# Altium PCB Kasli-DIOT.PCBDOC (part 8 of 23)
Units mm, origin at the board's own origin, x right, y up, seen from the top; angles counter-clockwise.
Board outline 222.9 x 100 mm, 10 copper layers (TopLayer, Layer 2, Layer 3, Layer 4, Layer 5, Layer 6, Layer 7, layer 8, Layer 9, BottomLayer), stack 1.564 mm thick; 977 components, 900 nets, 4676 pads, 2725 vias.
Unrouted connection lines stored in the file: 17.
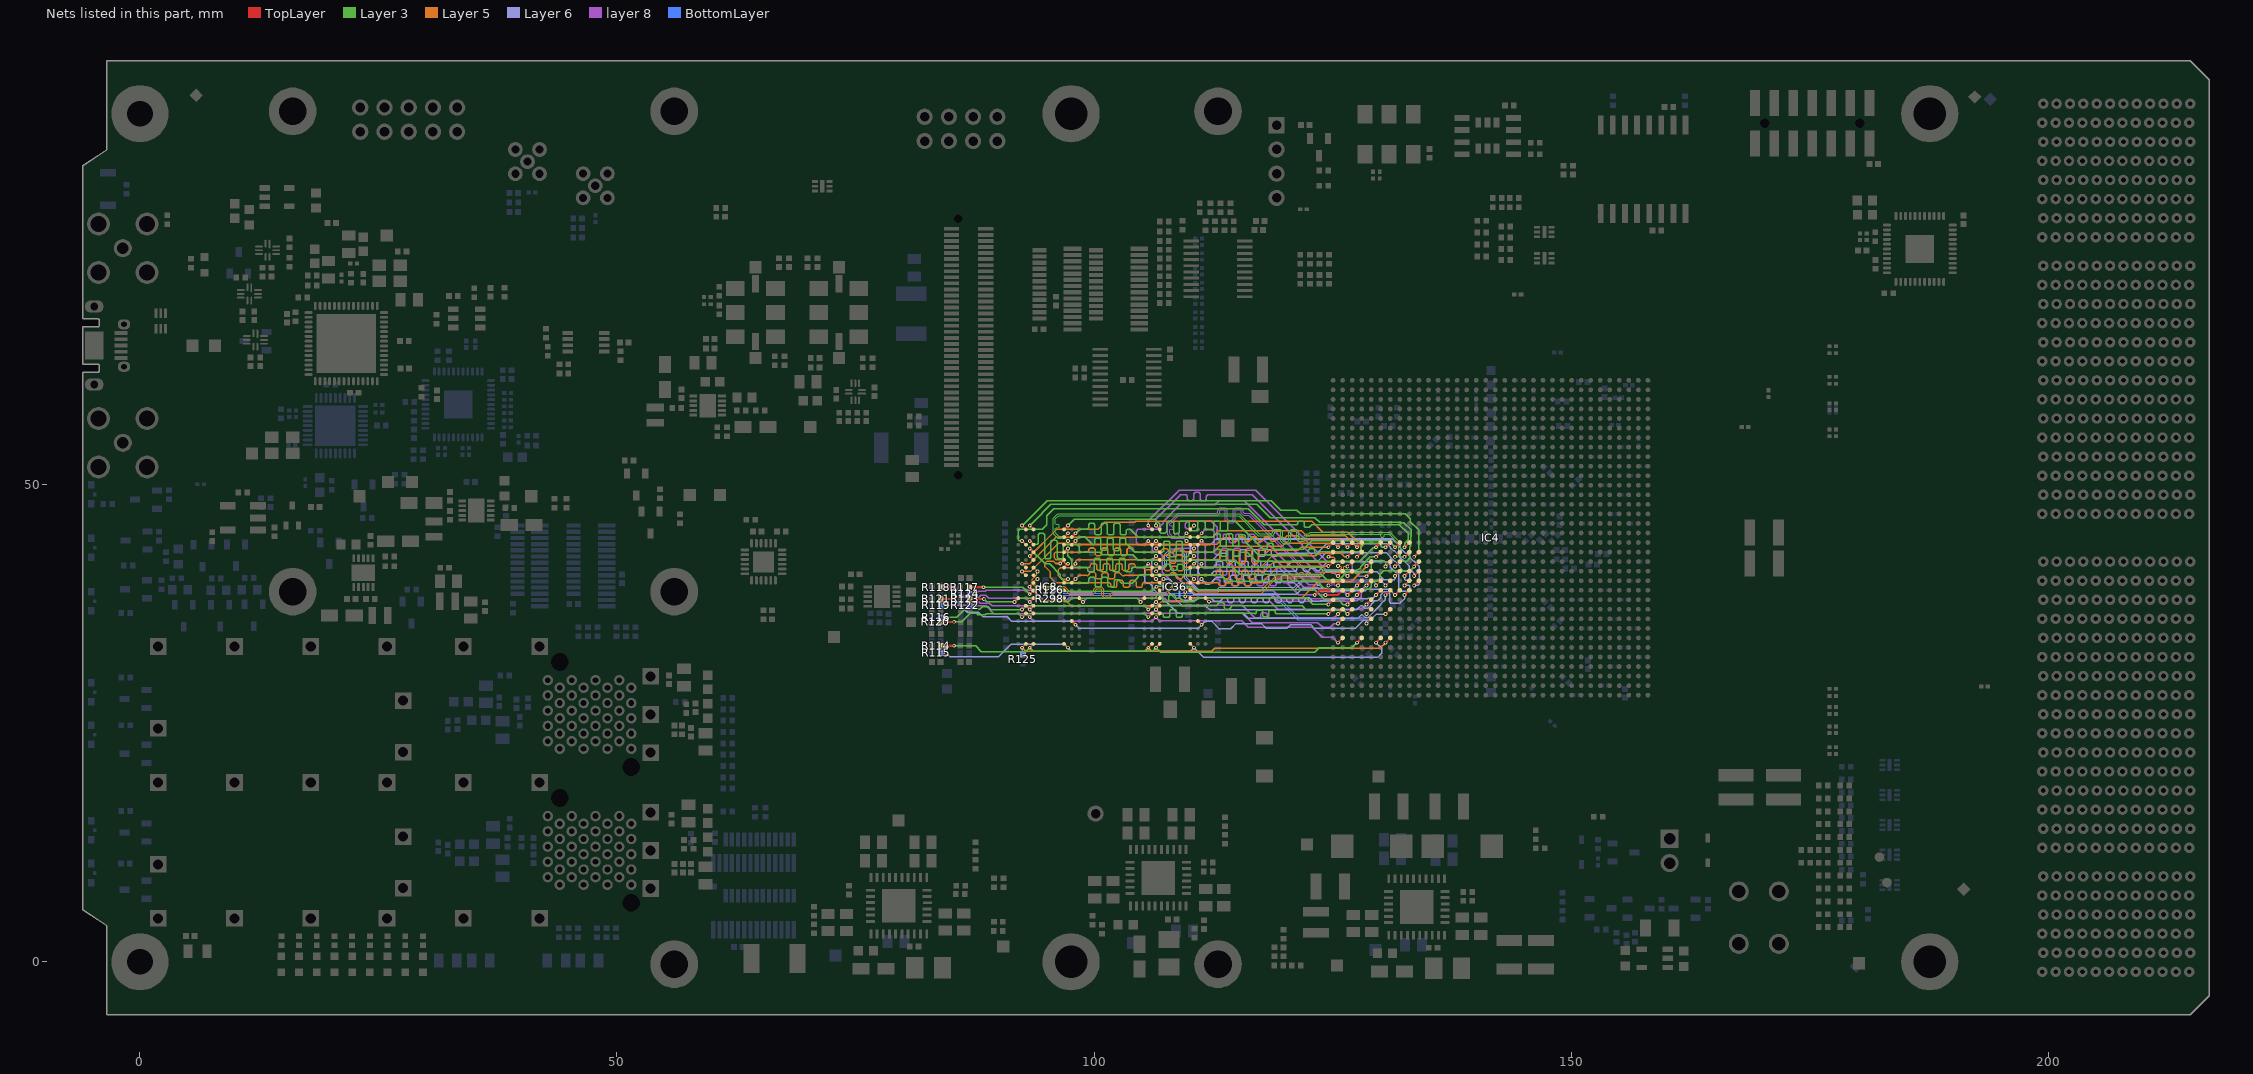
[diagram p14: the nets of this part, all layers, seen from the top]

## Via types
v1: diameter 0.4, hole 0.2, TopLayer to BottomLayer, tented both sides, 1723 vias
v2: diameter 0.5, hole 0.2, TopLayer to BottomLayer, tented both sides, 524 vias
v3: diameter 0.6, hole 0.3, TopLayer to BottomLayer, tented both sides, 172 vias
v4: diameter 0.6, hole 0.3, TopLayer to BottomLayer, 113 vias
v5: diameter 0.5, hole 0.2, TopLayer to BottomLayer, 107 vias
v6: diameter 0.4, hole 0.2, TopLayer to BottomLayer, 67 vias
v7: diameter 0.5, hole 0.25, TopLayer to BottomLayer, tented both sides, 12 vias
v8: diameter 0.8, hole 0.5, TopLayer to BottomLayer, tented both sides, 7 vias

## Nets (pads, with @x,y where several pads share a name; then routed paths per layer and width w, separated by ;. In a path a pad name is that pad's centre, name@x,y a point inside that pad or via, vN(x,y) a via of type N, cw(c..) or ccw(c..) an arc to the next point about the centre after c; other vN are vias at no path point) (continued)
DDR_A13: IC4.AH4 IC8.T3 IC36.T3 R114.1 | length 46.9
  TopLayer w0.22: R114.1@83.931,33.126 v1(85.342,33.126) v1@85.431,33.126 ; v1(93.264,32.925) 93.664,33.325 IC8.T3@93.661,33.325 ; v1(106.489,32.925) 106.889,33.325 IC36.T3@106.886,33.325 ; v1(127.561,33.45) IC4.AH4@128.061,33.95
  Layer 3 w0.15: v1(85.342,33.126) 87.585,33.126 88.186,32.525 92.864,32.525 v1(93.264,32.925) 93.639,32.55 105.844,32.55 105.869,32.575 106.139,32.575 v1(106.489,32.925) 106.989,32.425 123.136,32.425 123.611,32.9 127.011,32.9 v1(127.561,33.45)
DDR_A14: IC4.AH6 IC8.T7 IC36.T7 R115.1 | length 51.2
  TopLayer w0.22: IC8.T7@96.861,33.325 96.861,33.328 v1(97.261,32.928) ; IC36.T7@110.086,33.325 110.086,33.328 v1(110.486,32.928) ; v1(129.561,33.45) IC4.AH6@130.061,33.95
  Layer 6 w0.16: v1(84.489,32.38) 84.894,31.975 89.986,31.975 91.318,33.307 96.882,33.307 v1(97.261,32.928) 97.646,32.543 110.101,32.543 v1(110.486,32.928) 111.514,31.9 129.711,31.9 130.154,32.343 130.154,32.857 v1(129.561,33.45)
  BottomLayer w0.22: R115.1@83.911,32.38 v1(84.489,32.38)
DDR_BA0: IC4.AE1 IC8.M2 IC36.M2 R120.1 | length 46.9
  TopLayer w0.22: R120.1@83.892,35.638 v1(85.342,35.638) v1@85.392,35.638 ; v1(92.464,36.125) 92.864,36.525 IC8.M2@92.861,36.525 ; v1(105.689,36.125) 106.089,36.525 IC36.M2@106.086,36.525 ; v1(124.561,36.45) IC4.AE1@125.061,36.95
  Layer 3 w0.15: v1@85.392,35.638 85.403,35.65 86.161,35.65 87.041,36.53 87.696,36.53 87.822,36.404 88.618,36.404 88.715,36.502 92.087,36.502 v1(92.464,36.125) 92.844,36.505 105.309,36.505 v1(105.689,36.125) 106.069,36.505 106.452,36.505 107.185,36.505 107.284,36.406 107.284,36.23 107.383,36.131 107.843,36.131 107.942,36.23 107.942,36.779 108.041,36.878 108.501,36.878 108.6,36.779 108.6,36.23 108.699,36.131 109.159,36.131 109.258,36.23 109.258,36.406 109.357,36.505 110.071,36.505 110.305,36.505 110.341,36.54 110.651,36.54 ; 110.652,36.539 116.81,36.539 116.845,36.505 116.92,36.505 117.018,36.603 117.018,36.729 117.117,36.828 117.578,36.828 117.676,36.729 117.676,36.28 117.775,36.181 118.236,36.181 118.334,36.28 118.334,36.729 118.433,36.828 118.894,36.828 118.992,36.729 118.992,36.603 119.091,36.505 119.261,36.505 124.348,36.505 124.355,36.498 124.513,36.498 v1(124.561,36.45)
DDR_BA1: IC4.AE7 IC8.N8 IC36.N8 R121.1 | length 51.9
  TopLayer w0.22: R121.1@83.911,38.033 v1(85.342,38.033) v1@85.411,38.033 ; IC8.N8@97.661,35.725 97.661,35.728 v1(98.061,35.328) ; IC36.N8@110.886,35.725 110.886,35.728 v1(111.286,35.328) ; v1(130.561,36.45) IC4.AE7@131.061,36.95
  Layer 6 w0.16: v1(85.342,38.033) 86.725,36.65 87.868,36.65 88.353,36.165 90.906,36.165 91.361,35.71 97.679,35.71 v1(98.061,35.328) 98.446,34.943 110.901,34.943 v1(111.286,35.328) 111.668,35.71 112.302,35.71 113.108,34.904 114.344,34.904 114.891,35.45 117.559,35.45 118.066,34.943 120.21,34.943 120.592,35.325 122.739,35.325 122.789,35.275 123.121,34.943 127.387,34.943 128.269,35.825 128.986,35.825 129.611,36.45 v1(130.561,36.45)
DDR_BA2: IC4.AH2 IC8.M3 IC36.M3 R122.1 | length 42.4
  TopLayer w0.22: v1(93.264,36.125) 93.664,36.525 IC8.M3@93.661,36.525 ; v1(106.489,36.125) 106.889,36.525 IC36.M3@106.886,36.525 ; v1(125.561,33.45) IC4.AH2@126.061,33.95
  layer 8 w0.15: v1(87.529,37.355) 87.575,37.309 88.702,37.309 89.509,36.502 92.887,36.502 v1(93.264,36.125) 93.683,35.705 106.069,35.705 v1(106.489,36.125) 106.863,35.751 115.46,35.751 116.16,35.051 122.86,35.051 123.911,34 125.011,34 v1(125.561,33.45)
  BottomLayer w0.22: R122.1@86.951,37.355 v1(87.529,37.355)
DDR_CAS_N: IC4.AE2 IC8.K3 IC36.K3 R118.1 | length 46.3
  TopLayer w0.22: R118.1@83.911,39.26 v1(85.342,39.26) v1@85.411,39.26 ; v1(93.264,37.725) 93.664,38.125 IC8.K3@93.661,38.125 ; v1(106.489,37.725) 106.889,38.125 IC36.K3@106.886,38.125 ; v1(125.561,36.45) IC4.AE2@126.061,36.95
  layer 8 w0.15: v1@85.46,39.26 85.411,39.26 86.491,38.18 87.891,38.18 88.146,38.435 88.652,38.435 88.969,38.119 92.87,38.119 v1(93.264,37.725) 93.641,37.348 106.112,37.348 v1(106.489,37.725) 106.864,37.35 115.561,37.35 116.863,36.048 117.286,36.048 117.361,36.048 117.493,36.18 117.493,36.447 117.624,36.578 118.019,36.578 118.151,36.447 118.151,36.18 118.282,36.048 119.528,36.048 125.159,36.048 v1(125.561,36.45)
DDR_CK_N: IC4.AF5 IC8.K7 IC36.K7 R298.1 | length 36.2
  TopLayer w0.12: v1(96.407,38.303) 96.461,38.25 96.66,38.25 96.785,38.125 IC8.K7@96.861,38.125 ; v1(109.561,38.282) 109.876,38.282 110.033,38.125 IC36.K7@110.086,38.125 ; v1(128.561,35.45) IC4.AF5@129.061,35.95
  BottomLayer w0.12: R298.1@95.856,38.075 96.084,38.303 v1(96.407,38.303) 96.48,38.303 96.618,38.441 102.992,38.441 103.013,38.42 109.351,38.42 109.488,38.282 v1(109.561,38.282) 109.634,38.282 109.771,38.42 118.791,38.42 121.358,35.853 128.483,35.853 128.561,35.775 v1(128.561,35.45)
DDR_CK_P: IC4.AE5 IC8.J7 IC36.J7 R126.1 | length 36.2
  TopLayer w0.12: v1(96.407,38.788) 96.461,38.842 96.702,38.842 96.785,38.925 IC8.J7@96.861,38.925 ; v1(109.561,38.767) 109.876,38.767 110.033,38.925 IC36.J7@110.086,38.925 ; v1(128.561,36.45) IC4.AE5@129.061,36.95
  BottomLayer w0.12: R126.1@95.856,39.025 95.856,39.018 96.086,38.788 v1(96.407,38.788) 96.48,38.788 96.618,38.651 103.079,38.651 103.1,38.63 109.351,38.63 109.488,38.767 v1(109.561,38.767) 109.634,38.767 109.771,38.63 118.878,38.63 121.445,36.063 128.491,36.063 128.561,36.133 v1(128.561,36.45)
DDR_CKE: IC4.AD5 IC8.K9 IC36.K9 R124.1 | length 45.4
  TopLayer w0.22: IC8.K9@98.461,38.125 98.461,38.128 v1(98.861,37.728) ; IC36.K9@111.686,38.125 v1(112.061,37.75) ; v1(128.561,37.45) IC4.AD5@129.061,37.95
  layer 8 w0.15: v1(87.529,38.582) 87.594,38.582 87.87,38.858 88.597,38.858 88.682,38.943 93.624,38.943 94.668,37.898 97.159,37.898 97.42,38.159 98.43,38.159 v1(98.861,37.728) 99.245,38.112 107.399,38.112 107.661,37.85 109.961,37.85 110.236,38.125 111.686,38.125 v1(112.061,37.75) 118.461,37.75 118.561,37.65 119.261,36.95 126.361,36.95 128.061,36.95 v1(128.561,37.45)
  BottomLayer w0.22: R124.1@86.951,38.582 v1(87.529,38.582)
DDR_CS_N: IC4.AE3 IC8.L2 IC36.L2 R116.1 | length 46.8
  TopLayer w0.22: v1(92.464,36.925) 92.864,37.325 IC8.L2@92.861,37.325 ; v1(105.689,36.925) 106.089,37.325 IC36.L2@106.086,37.325 ; v1(126.561,36.45) IC4.AE3@127.061,36.95
  Layer 3 w0.15: v1(84.489,36.115) 85.639,36.115 86.477,36.953 88.029,36.953 88.284,37.208 88.894,37.208 89.177,36.925 v1(92.464,36.925) 92.844,37.305 105.309,37.305 v1(105.689,36.925) 106.069,37.305 112.786,37.305 112.861,37.305 112.993,37.436 112.993,37.518 113.124,37.65 113.519,37.65 113.651,37.518 113.651,37.09 113.782,36.959 114.177,36.959 114.309,37.09 114.309,37.173 114.44,37.305 114.461,37.305 114.536,37.305 121.806,37.305 122.261,36.85 123.861,36.85 123.863,36.852 126.159,36.852 v1(126.561,36.45)
  BottomLayer w0.22: R116.1@83.911,36.115 v1(84.489,36.115)
DDR_DM0: IC4.AB10 IC36.E7 | length 30.5
  TopLayer w0.22: IC36.E7@110.086,42.125 110.083,42.125 v1(110.483,42.525) ; v1(133.561,39.45) IC4.AB10@134.061,39.95
  Layer 6 w0.16: v1(110.483,42.525) 110.091,42.918 110.091,43.481 110.425,43.815 111.077,43.815 111.137,43.755 112.23,43.755 112.793,44.319 131.271,44.319 132.061,43.529 132.061,43.413 132.624,42.85 132.732,42.85 133.128,42.453 133.128,42.345 133.497,41.976 133.572,41.976 133.941,41.607 133.941,41.6 134.086,41.455 134.086,39.6 133.936,39.45 v1(133.561,39.45)
DDR_DM1: IC4.AC1 IC36.D3 | length 29.6
  TopLayer w0.22: v1(106.486,43.322) 106.886,42.922 IC36.D3@106.886,42.925 ; v1(123.138,38.45) 123.161,38.45 123.661,38.95 IC4.AC1@125.061,38.95
  layer 8 w0.15: v1(106.486,43.322) 106.875,43.711 110.703,43.711 110.886,43.528 110.886,39.929 111.065,39.75 111.422,39.75 111.425,39.747 112.311,39.747 112.386,39.747 112.518,39.879 112.518,39.961 112.649,40.093 113.044,40.093 113.176,39.961 113.176,39.533 113.307,39.401 113.702,39.401 113.834,39.533 113.834,39.961 113.965,40.093 114.36,40.093 114.492,39.961 114.492,39.533 114.623,39.401 115.018,39.401 115.15,39.533 115.15,39.961 115.281,40.093 115.676,40.093 115.808,39.961 115.808,39.533 115.939,39.401 116.334,39.401 116.466,39.533 116.466,39.961 116.597,40.093 116.992,40.093 117.124,39.961 117.124,39.533 117.255,39.401 117.65,39.401 117.782,39.533 117.782,39.961 117.913,40.093 118.308,40.093 118.44,39.961 118.44,39.533 118.571,39.401 118.966,39.401 119.098,39.533 119.098,39.961 119.229,40.093 119.624,40.093 119.756,39.961 119.756,39.879 119.887,39.747 120.07,39.747 120.189,39.747 121.486,38.45 v1(123.138,38.45)
DDR_DM2: IC4.Y1 IC8.E7 | length 38.9
  TopLayer w0.22: v1(96.461,41.75) 96.474,41.75 96.848,42.125 IC8.E7@96.861,42.125 ; v1(124.561,41.479) 124.59,41.479 IC4.Y1@125.061,41.95
  Layer 5 w0.16: v1(96.461,41.75) 95.979,41.75 95.729,42 95.086,42 94.861,41.775 94.861,41.425 95.436,40.85 95.436,40.275 95.976,39.735 101.069,39.735 101.082,39.748 101.605,39.748 101.738,39.614 101.738,39.398 101.872,39.264 102.273,39.264 102.406,39.398 102.406,39.848 102.54,39.982 102.941,39.982 103.074,39.848 103.074,39.398 103.208,39.264 103.609,39.264 103.742,39.398 103.742,39.848 103.876,39.982 104.277,39.982 104.41,39.848 104.41,39.398 104.544,39.264 104.945,39.264 105.078,39.398 105.078,39.614 105.212,39.748 105.292,39.748 112.211,39.748 112.959,39.748 113.093,39.614 113.093,39.535 113.226,39.402 113.627,39.402 113.761,39.535 113.761,39.62 113.894,39.753 114.295,39.753 114.429,39.62 114.429,39.535 114.562,39.402 114.963,39.402 115.097,39.535 115.097,39.62 115.23,39.753 115.631,39.753 115.765,39.62 115.765,39.535 115.898,39.402 116.299,39.402 116.433,39.535 116.433,39.614 116.566,39.748 116.678,39.748 117.584,39.748 119.286,41.45 124.532,41.45 v1(124.561,41.479)
DDR_DM3: IC4.Y10 IC8.D3 | length 49.5
  TopLayer w0.22: v1(93.261,43.322) 93.661,42.922 IC8.D3@93.661,42.925 ; v1(133.561,41.45) IC4.Y10@134.061,41.95
  Layer 3 w0.15: v1(93.261,43.322) 94.883,41.7 95.336,41.7 96.461,40.575 96.461,40.32 97.081,39.7 99.261,39.7 99.336,39.7 99.468,39.832 99.468,40.168 99.599,40.3 99.994,40.3 100.126,40.168 100.126,39.424 100.257,39.292 100.652,39.292 100.784,39.424 100.784,40.168 100.915,40.3 101.31,40.3 101.442,40.168 101.442,39.424 101.573,39.292 101.968,39.292 102.1,39.424 102.1,39.908 102.231,40.04 102.626,40.04 102.758,39.908 102.758,39.832 102.889,39.7 103.33,39.7 103.986,39.7 104.511,40.225 104.511,40.278 104.781,40.547 113.289,40.547 113.968,39.868 123.396,39.868 124.212,39.052 128.779,39.052 129.05,39.322 129.05,39.622 129.295,39.868 129.648,39.868 129.936,40.156 129.936,40.575 130.361,41.001 133.154,41.001 133.561,41.408 v1(133.561,41.45)
DDR_DQ0: IC4.AC8 IC36.E3 | length 30.4
  TopLayer w0.22: v1(106.486,42.522) 106.883,42.125 IC36.E3@106.886,42.125 ; v1(131.561,38.45) IC4.AC8@132.061,38.95
  Layer 6 w0.16: v1(106.486,42.522) 106.061,42.097 106.061,40.687 106.198,40.55 108.45,40.55 110.45,38.55 110.941,38.55 110.944,38.548 111.623,38.548 111.625,38.55 121.261,38.55 121.861,39.15 124.324,39.15 124.404,39.07 124.425,39.07 124.595,38.9 126.406,38.9 126.422,38.883 128.426,38.883 128.615,39.073 130.938,39.073 v1(131.561,38.45)
DDR_DQ1: IC4.AA10 IC36.F7 | length 31.3
  TopLayer w0.22: IC36.F7@110.086,41.325 110.083,41.325 v1(110.483,41.725) ; v1(133.561,40.45) IC4.AA10@134.061,40.95
  Layer 6 w0.16: v1(110.483,41.725) 110.883,42.125 112.436,42.125 113.161,42.85 113.711,42.85 113.791,42.85 113.925,42.984 113.925,43.062 114.058,43.196 114.459,43.196 114.593,43.062 114.593,42.638 114.726,42.504 115.127,42.504 115.261,42.638 115.261,43.062 115.394,43.196 115.795,43.196 115.929,43.062 115.929,42.638 116.062,42.504 116.463,42.504 116.597,42.638 116.597,43.062 116.73,43.196 117.131,43.196 117.265,43.062 117.265,42.638 117.398,42.504 117.799,42.504 117.933,42.638 117.933,43.062 118.066,43.196 118.467,43.196 118.601,43.062 118.601,42.638 118.734,42.504 119.135,42.504 119.269,42.638 119.269,42.716 119.402,42.85 119.632,42.85 123.411,42.85 124.376,43.815 124.389,43.815 124.404,43.83 124.718,43.83 124.733,43.815 125.389,43.815 125.404,43.83 125.718,43.83 125.733,43.815 126.389,43.815 126.404,43.83 126.718,43.83 126.733,43.815 127.389,43.815 127.404,43.83 127.718,43.83 127.733,43.815 128.389,43.815 128.404,43.83 128.718,43.83 128.733,43.815 129.389,43.815 129.404,43.83 129.718,43.83 129.733,43.815 130.389,43.815 130.404,43.83 130.718,43.83 131.061,43.487 131.061,43.413 131.404,43.07 131.5,43.07 132.043,42.526 132.043,42.412 132.37,42.085 132.436,42.085 132.674,41.846 132.702,41.846 132.941,41.607 132.941,41.58 133.061,41.46 133.061,41.225 133.547,40.739 133.547,40.464 v1(133.561,40.45)
DDR_DQ2: IC4.AC7 IC36.F2 | length 31.8
  TopLayer w0.22: v1(105.681,41.73) 105.681,41.727 106.083,41.325 IC36.F2@106.086,41.325 ; v1(130.561,38.429) 130.561,38.45 IC4.AC7@131.061,38.95
  Layer 6 w0.16: v1(105.681,41.73) 105.681,41.717 105.3,41.336 105.3,39.91 105.523,39.687 105.827,39.687 106.1,39.414 106.1,39.208 106.373,38.935 106.383,38.935 108.772,36.546 115.64,36.546 116.168,36.018 127.666,36.018 128.005,36.357 128.138,36.357 128.41,36.085 128.733,36.085 130.067,37.418 130.067,37.493 130.535,37.961 130.535,38.403 v1(130.561,38.429)
DDR_DQ3: IC4.AA9 IC36.F8 | length 31.6
  TopLayer w0.22: IC36.F8@110.886,41.325 110.883,41.325 v1(111.283,41.725) ; v1(132.561,40.45) IC4.AA9@133.061,40.95
  Layer 6 w0.16: v1(111.283,41.725) 111.304,41.704 111.304,41.414 111.398,41.32 112.235,41.32 112.24,41.314 112.537,41.314 112.607,41.385 112.687,41.385 112.821,41.519 112.821,41.876 112.954,42.01 113.355,42.01 113.489,41.876 113.489,41.494 113.622,41.361 114.023,41.361 114.157,41.494 114.157,41.876 114.29,42.01 114.691,42.01 114.825,41.876 114.825,41.494 114.958,41.361 115.359,41.361 115.493,41.494 115.493,41.876 115.626,42.01 116.027,42.01 116.161,41.876 116.161,41.494 116.294,41.361 116.695,41.361 116.829,41.494 116.829,41.876 116.962,42.01 117.363,42.01 117.497,41.876 117.497,41.494 117.63,41.361 118.031,41.361 118.165,41.494 118.165,41.876 118.298,42.01 118.699,42.01 118.833,41.876 118.833,41.519 118.966,41.385 120.143,41.385 120.785,42.027 123.479,42.027 124.354,42.902 130.632,42.902 130.703,42.83 130.718,42.83 131.061,42.487 131.061,42.413 131.464,42.01 131.538,42.01 132.033,41.516 132.033,41.378 132.491,40.92 132.916,40.92 133.086,40.75 133.086,40.125 132.937,39.976 132.688,39.976 132.595,40.069 132.595,40.416 v1(132.561,40.45)
DDR_DQ4: IC4.AC6 IC36.H3 | length 30.5
  TopLayer w0.22: IC36.H3@106.886,39.725 107.286,40.125 v1(107.286,40.128) ; v1(129.561,38.45) IC4.AC6@130.061,38.95
  Layer 6 w0.16: v1(107.286,40.128) 107.291,40.122 107.889,40.122 108.961,39.05 108.961,38.15 109.228,37.883 110.664,37.883 110.935,38.154 112.232,38.154 112.593,37.793 113.15,37.793 113.23,37.793 113.385,37.949 113.385,38.004 113.541,38.16 113.852,38.16 114.007,38.004 114.007,37.805 114.163,37.65 114.474,37.65 114.629,37.805 114.629,38.004 114.785,38.16 115.096,38.16 115.251,38.004 115.251,37.805 115.407,37.65 115.718,37.65 115.873,37.805 115.873,38.004 116.029,38.16 116.34,38.16 116.495,38.004 116.495,37.805 116.651,37.65 116.962,37.65 117.117,37.805 117.117,38.004 117.273,38.16 117.584,38.16 117.739,38.004 117.739,37.805 117.895,37.65 118.206,37.65 118.361,37.805 118.361,38.004 118.517,38.16 118.828,38.16 118.983,38.004 118.983,37.805 119.139,37.65 119.45,37.65 119.605,37.805 119.605,38.004 119.761,38.16 120.072,38.16 120.227,38.004 120.227,37.805 120.383,37.65 120.694,37.65 120.849,37.805 120.849,38.004 121.005,38.16 121.316,38.16 121.471,38.004 121.471,37.805 121.627,37.65 121.938,37.65 122.093,37.805 122.093,38.004 122.249,38.16 122.56,38.16 122.715,38.004 122.715,37.949 122.871,37.793 123.391,37.793 123.712,37.793 123.769,37.85 124.991,37.85 125.241,38.1 126.374,38.1 126.404,38.07 128.718,38.07 128.748,38.1 129.211,38.1 v1(129.561,38.45)
DDR_DQ5: IC4.AA8 IC36.H8 | length 30.6
  TopLayer w0.22: IC36.H8@110.886,39.725 110.886,39.728 111.283,40.125 v1(111.283,40.128) ; v1(131.561,40.45) IC4.AA8@132.061,40.95
  Layer 6 w0.16: v1(111.283,40.128) 111.283,40.063 111.394,39.952 111.394,39.934 111.728,39.6 112.111,39.6 112.788,40.277 112.836,40.325 113.536,40.325 113.636,40.225 113.636,39.846 113.736,39.745 114.204,39.745 114.304,39.846 114.304,40.41 114.404,40.51 114.872,40.51 114.972,40.41 114.972,39.846 115.072,39.745 115.54,39.745 115.64,39.846 115.64,40.41 115.74,40.51 116.208,40.51 116.308,40.41 116.308,39.846 116.408,39.745 116.876,39.745 116.976,39.846 116.976,40.41 117.076,40.51 117.544,40.51 117.644,40.41 117.644,39.846 117.744,39.745 118.212,39.745 118.312,39.846 118.312,40.41 118.412,40.51 118.88,40.51 118.98,40.41 118.98,39.846 119.08,39.745 119.548,39.745 119.648,39.846 119.648,40.41 119.748,40.51 120.216,40.51 120.316,40.41 120.316,39.846 120.416,39.745 120.884,39.745 120.984,39.846 120.984,40.33 121.084,40.43 121.232,40.43 123.841,40.43 124.318,40.907 129.641,40.907 129.941,40.607 129.941,40.491 130.382,40.05 131.467,40.05 131.561,40.144 v1(131.561,40.45)
DDR_DQ6: IC4.AC9 IC36.G2 | length 31.5
  TopLayer w0.22: IC36.G2@106.086,40.525 106.483,40.128 v1(106.486,40.128) ; v1(132.561,38.45) IC4.AC9@133.061,38.95
  Layer 6 w0.16: v1(106.486,40.128) 106.486,40.078 108.914,37.65 109.234,37.33 111.706,37.33 112.111,36.925 127.544,36.925 127.623,37.005 127.653,37.005 127.995,37.346 128.127,37.346 128.404,37.07 128.718,37.07 129.061,37.412 129.061,37.487 129.425,37.852 129.713,37.852 130.077,38.216 130.077,38.482 130.408,38.813 130.714,38.813 131.007,38.52 131.007,37.679 131.111,37.575 132.055,37.575 132.561,38.081 v1(132.561,38.45)
DDR_DQ7: IC4.AB9 IC36.H7 | length 31.1
  TopLayer w0.22: IC36.H7@110.086,39.725 110.086,39.728 110.483,40.125 v1(110.483,40.128) ; v1(132.561,39.45) IC4.AB9@133.061,39.95
  Layer 6 w0.16: v1(110.483,40.128) 110.481,40.128 110.103,40.505 110.103,41.129 110.305,41.331 110.705,41.331 110.911,41.125 110.911,40.785 110.918,40.778 110.918,40.774 111.132,40.56 112.235,40.56 112.448,40.774 112.448,40.809 112.589,40.95 121.04,40.95 121.12,40.95 121.253,41.084 121.253,41.342 121.387,41.475 121.788,41.475 121.921,41.342 121.921,41.082 122.055,40.948 122.456,40.948 122.589,41.082 122.589,41.135 122.723,41.269 123.124,41.269 123.257,41.135 123.257,41.119 123.391,40.985 123.58,40.985 123.71,41.116 123.71,41.166 124.404,41.859 124.421,41.859 124.512,41.95 130.718,41.95 131.061,41.607 131.061,41.354 131.569,40.846 131.702,40.846 131.941,40.607 131.941,39.293 131.924,39.276 131.924,39.037 132.102,38.859 132.945,38.859 133.111,39.025 133.111,39.381 133.017,39.475 132.586,39.475 v1(132.561,39.45)
DDR_DQ8: IC4.AC4 IC36.D7 | length 29.1
  TopLayer w0.22: IC36.D7@110.086,42.925 110.086,42.928 110.48,43.322 v1(110.483,43.322) ; v1(127.561,38.45) IC4.AC4@128.061,38.95
  layer 8 w0.15: v1(110.483,43.322) 110.48,43.325 108.586,43.325 108.286,43.025 108.286,42.754 108.418,42.623 109.398,42.623 109.53,42.491 109.53,42.096 109.398,41.965 108.072,41.965 107.94,41.833 107.94,41.438 108.072,41.307 108.154,41.307 108.286,41.175 108.286,41.1 108.286,40.8 109.461,39.625 110.186,39.625 110.911,38.9 118.811,38.9 119.644,38.067 127.178,38.067 v1(127.561,38.45)
DDR_DQ9: IC4.AB5 IC36.C3 | length 29.2
  TopLayer w0.22: v1(106.486,44.122) 106.886,43.722 IC36.C3@106.886,43.725 ; v1(128.561,39.45) IC4.AB5@129.061,39.95
  layer 8 w0.15: v1(106.486,44.122) 106.101,43.738 106.101,43.139 106.303,42.937 106.849,42.937 107.161,42.625 107.161,40.85 108.836,39.175 109.811,39.175 110.511,38.475 118.536,38.475 119.194,37.817 127.281,37.817 127.29,37.825 127.571,37.825 128.037,38.291 128.037,38.926 v1(128.561,39.45)
DDR_DQ10: IC4.AC2 IC36.C8 | length 28.9
  TopLayer w0.22: IC36.C8@110.886,43.725 110.886,43.728 111.283,44.125 v1(111.283,44.135) ; v1(124.261,38.442) 124.269,38.45 125.561,38.45 IC4.AC2@126.061,38.95
  layer 8 w0.15: v1(111.283,44.135) 111.283,44.125 111.675,43.733 111.675,41.493 111.853,41.315 112.232,41.315 112.258,41.289 112.382,41.289 112.457,41.289 112.589,41.421 112.589,41.504 112.72,41.635 113.115,41.635 113.247,41.504 113.247,40.631 113.378,40.499 113.773,40.499 113.905,40.631 113.905,41.504 114.036,41.635 114.431,41.635 114.563,41.504 114.563,40.631 114.694,40.499 115.089,40.499 115.221,40.631 115.221,41.504 115.352,41.635 115.747,41.635 115.879,41.504 115.879,40.631 116.01,40.499 116.405,40.499 116.537,40.631 116.537,41.504 116.668,41.635 117.063,41.635 117.195,41.504 117.195,40.631 117.326,40.499 117.721,40.499 117.853,40.631 117.853,41.504 117.984,41.635 118.379,41.635 118.511,41.504 118.511,40.631 118.642,40.499 119.037,40.499 119.169,40.631 119.169,41.158 119.3,41.289 119.405,41.289 119.422,41.289 121.761,38.95 123.211,38.95 123.711,38.45 124.253,38.45 v1(124.261,38.442)
DDR_DQ11: IC4.AA2 IC36.C2 | length 29.9
  TopLayer w0.22: v1(105.686,44.122) 106.086,43.722 IC36.C2@106.086,43.725 ; v1(125.561,40.45) IC4.AA2@126.061,40.95
  layer 8 w0.15: v1(105.686,44.122) 105.283,43.719 104.653,43.719 104.411,43.961 104.411,45.15 104.586,45.325 106.625,45.325 107.261,45.961 107.261,46.15 109.011,47.9 112.661,47.9 113.111,48.35 115.761,48.35 123.301,40.81 124.865,40.81 124.945,40.73 125.24,40.73 125.52,40.45 v1(125.561,40.45)
DDR_DQ12: IC4.AB4 IC36.A7 | length 29
  TopLayer w0.22: IC36.A7@110.086,45.325 110.083,45.325 v1(110.483,45.725) ; v1(127.561,39.45) IC4.AB4@128.061,39.95
  layer 8 w0.15: v1(110.483,45.725) 110.158,45.4 109.736,45.4 109.561,45.575 109.561,45.925 109.836,46.2 112.286,46.2 112.911,45.575 112.911,44.475 113.123,44.263 113.336,44.263 113.411,44.263 113.543,44.394 113.543,44.691 113.674,44.822 114.069,44.822 114.201,44.691 114.201,44.048 114.332,43.917 114.727,43.917 114.859,44.048 114.859,44.691 114.99,44.822 115.385,44.822 115.517,44.691 115.517,44.048 115.648,43.917 116.043,43.917 116.175,44.048 116.175,44.691 116.306,44.822 116.701,44.822 116.833,44.691 116.833,44.048 116.964,43.917 117.359,43.917 117.491,44.048 117.491,44.131 117.622,44.263 117.798,44.263 117.817,44.244 122.511,39.55 123.661,39.55 124.144,39.067 124.52,39.067 124.545,39.042 127.153,39.042 v1(127.561,39.45)
DDR_DQ13: IC4.AA5 IC36.A2 | length 30
  TopLayer w0.22: v1(105.686,45.722) 106.086,45.322 IC36.A2@106.086,45.325 ; v1(128.556,40.411) 128.556,40.445 IC4.AA5@129.061,40.95
  layer 8 w0.15: v1(105.686,45.722) 105.686,46.226 108.91,49.45 116.949,49.45 124.451,41.948 126.727,41.948 127.059,41.616 127.059,41.162 127.81,40.411 v1(128.556,40.411)
DDR_DQ14: IC4.AC3 IC36.B8 | length 29.2
  TopLayer w0.22: IC36.B8@110.889,44.525 IC36.B8@110.886,44.525 v1(111.286,44.925) ; v1(126.561,38.45) IC4.AC3@127.061,38.95
  layer 8 w0.15: v1(111.286,44.925) 111.683,45.322 112.349,45.322 112.586,45.085 112.586,42.892 112.803,42.675 113.136,42.675 113.211,42.675 113.343,42.807 113.343,43.227 113.474,43.359 113.869,43.359 114.001,43.227 114.001,42.13 114.132,41.998 114.527,41.998 114.659,42.13 114.659,43.227 114.79,43.359 115.185,43.359 115.317,43.227 115.317,42.13 115.448,41.998 115.843,41.998 115.975,42.13 115.975,43.227 116.106,43.359 116.501,43.359 116.633,43.227 116.633,42.13 116.764,41.998 117.159,41.998 117.291,42.13 117.291,43.227 117.422,43.359 117.817,43.359 117.949,43.227 117.949,42.807 118.08,42.675 118.308,42.675 118.536,42.675 121.961,39.25 123.361,39.25 123.823,38.788 124.077,38.788 124.106,38.817 124.416,38.817 124.445,38.788 126.223,38.788 v1(126.561,38.45)
DDR_DQ15: IC4.AA3 IC36.A3 | length 28.9
  TopLayer w0.22: v1(106.486,45.722) 106.886,45.322 IC36.A3@106.886,45.325 ; v1(126.561,40.45) IC4.AA3@127.061,40.95
  layer 8 w0.15: v1(106.486,45.722) 106.486,46.375 108.932,48.821 109.061,48.95 109.665,48.95 109.797,48.818 109.797,48.482 109.929,48.35 110.323,48.35 110.455,48.482 110.455,49.065 110.587,49.197 110.981,49.197 111.113,49.065 111.113,48.482 111.245,48.35 111.639,48.35 111.771,48.482 111.771,48.818 111.903,48.95 113.271,48.95 116.561,48.95 121.813,43.698 121.813,43.589 124.298,41.104 125.907,41.104 v1(126.561,40.45)
DDR_DQ16: IC4.W4 IC8.E3 | length 39.9
  TopLayer w0.22: v1(93.261,42.522) 93.661,42.122 IC8.E3@93.661,42.125 ; v1(127.561,42.45) IC4.W4@128.061,42.95
  Layer 5 w0.16: v1(93.261,42.522) 96.067,45.329 100.387,45.329 101.132,46.073 104.259,46.073 104.38,46.194 122.817,46.194 123.983,45.028 126.597,45.028 127.978,43.648 127.978,42.867 v1(127.561,42.45)
DDR_DQ17: IC4.V2 IC8.F7 | length 39
  TopLayer w0.22: IC8.F7@96.861,41.325 96.858,41.325 v1(97.258,41.725) ; v1(125.561,43.45) IC4.V2@126.061,43.95
  Layer 5 w0.16: v1(97.258,41.725) 97.241,41.742 97.009,41.742 96.601,42.15 96.036,42.15 95.811,42.375 95.811,42.775 95.98,42.944 98.993,42.944 99.029,42.979 99.222,42.979 99.236,42.965 99.316,42.965 99.45,43.099 99.45,43.242 99.583,43.376 99.984,43.376 100.118,43.242 100.118,42.716 100.251,42.582 100.652,42.582 100.786,42.716 100.786,43.242 100.919,43.376 101.32,43.376 101.454,43.242 101.454,42.716 101.587,42.582 101.988,42.582 102.122,42.716 102.122,43.242 102.255,43.376 102.656,43.376 102.79,43.242 102.79,42.716 102.923,42.582 103.324,42.582 103.458,42.716 103.458,43.242 103.591,43.376 103.992,43.376 104.126,43.242 104.126,43.099 104.259,42.965 104.513,42.965 104.575,42.965 104.61,42.93 106.85,42.93 106.886,42.965 106.966,42.965 107.1,43.099 107.1,43.178 107.233,43.311 107.634,43.311 107.768,43.178 107.768,43.031 107.901,42.898 108.302,42.898 108.436,43.031 108.436,43.178 108.569,43.311 108.97,43.311 109.104,43.178 109.104,43.099 109.237,42.965 109.811,42.965 109.843,42.933 112.494,42.933 113.111,43.55 119.692,43.55 119.992,43.85 125.161,43.85 v1(125.561,43.45)
DDR_DQ18: IC4.V4 IC8.F2 | length 38.5
  TopLayer w0.22: v1(92.461,41.722) 92.861,41.322 IC8.F2@92.861,41.325 ; v1(127.561,43.45) IC4.V4@128.061,43.95
  Layer 5 w0.16: v1(92.461,41.722) 93.233,41.722 96.017,44.506 104.733,44.506 104.742,44.516 112.23,44.516 112.239,44.506 112.417,44.506 113.11,45.199 121.712,45.199 122.261,44.65 126.361,44.65 v1(127.561,43.45)
DDR_DQ19: IC4.V1 IC8.F8 | length 39.2
  TopLayer w0.22: IC8.F8@97.661,41.325 97.658,41.325 v1(98.058,41.725) ; v1(124.561,43.45) IC4.V1@125.061,43.95
  Layer 5 w0.16: v1(98.058,41.725) 98.079,41.746 98.079,42.006 98.215,42.142 107.036,42.142 107.078,42.142 107.086,42.15 107.116,42.15 107.25,42.284 107.25,42.504 107.384,42.638 107.784,42.638 107.918,42.504 107.918,41.931 108.052,41.797 108.452,41.797 108.586,41.931 108.586,42.512 108.72,42.646 109.12,42.646 109.254,42.512 109.254,41.931 109.388,41.797 109.788,41.797 109.922,41.931 109.922,42.016 110.056,42.15 110.361,42.15 110.411,42.15 110.437,42.124 112.968,42.124 112.994,42.15 113.074,42.15 113.207,42.284 113.207,43.028 113.341,43.162 113.742,43.162 113.875,43.028 113.875,41.918 114.009,41.784 114.41,41.784 114.543,41.918 114.543,43.028 114.677,43.162 115.078,43.162 115.211,43.028 115.211,41.918 115.345,41.784 115.746,41.784 115.879,41.918 115.879,43.028 116.013,43.162 116.414,43.162 116.547,43.028 116.547,41.918 116.681,41.784 117.082,41.784 117.215,41.918 117.215,43.025 117.349,43.159 117.75,43.159 117.965,42.943 118.154,42.943 118.351,43.14 118.361,43.15 121.395,43.15 121.695,43.45 v1(124.561,43.45)
DDR_DQ20: IC4.Y5 IC8.H3 | length 39.2
  TopLayer w0.22: v1(93.223,39.318) 93.243,39.318 93.65,39.725 IC8.H3@93.661,39.725 ; v1(128.577,41.498) 128.609,41.498 IC4.Y5@129.061,41.95
  Layer 5 w0.16: v1(93.223,39.318) 93.223,39.308 93.991,38.539 94.68,37.85 97.061,37.85 97.261,37.65 97.598,37.313 106.624,37.313 106.961,37.65 107.061,37.75 109.861,37.75 110.261,38.15 121.795,38.15 123.495,39.85 126.961,39.85 128.577,41.466 v1(128.577,41.498)
DDR_DQ21: IC4.W1 IC8.H8 | length 38.9
  TopLayer w0.22: IC8.H8@97.661,39.725 97.658,39.725 v1(98.058,40.125) ; v1(124.572,42.461) IC4.W1@125.061,42.95
  Layer 5 w0.16: v1(98.058,40.125) 98.453,40.519 99.255,40.519 99.286,40.488 99.366,40.488 99.5,40.622 99.5,40.7 99.633,40.834 100.034,40.834 100.168,40.7 100.168,40.276 100.301,40.142 100.702,40.142 100.836,40.276 100.836,40.626 100.969,40.759 101.37,40.759 101.504,40.626 101.504,40.276 101.637,40.142 102.038,40.142 102.172,40.276 102.172,40.626 102.305,40.759 102.706,40.759 102.84,40.626 102.84,40.622 102.973,40.488 103.186,40.488 ; 103.194,40.496 104.722,40.496 104.729,40.502 105.043,40.502 105.05,40.496 105.133,40.496 ; 105.141,40.488 105.221,40.488 105.355,40.622 105.355,40.955 105.488,41.089 105.889,41.089 106.023,40.955 106.023,40.622 106.156,40.488 106.311,40.488 106.352,40.529 107.72,40.529 107.761,40.488 107.841,40.488 107.975,40.622 107.975,40.635 108.108,40.768 108.509,40.768 108.643,40.635 108.643,40.276 108.776,40.142 109.177,40.142 109.311,40.276 109.311,40.354 109.444,40.488 110.111,40.488 110.143,40.52 112.579,40.52 112.611,40.488 112.691,40.488 112.825,40.622 112.825,40.903 112.958,41.037 113.359,41.037 113.493,40.903 113.493,40.276 113.626,40.142 114.027,40.142 114.161,40.276 114.161,40.903 114.294,41.037 114.695,41.037 114.829,40.903 114.829,40.276 114.962,40.142 115.363,40.142 115.497,40.276 115.497,40.903 115.63,41.037 116.031,41.037 116.165,40.903 116.165,40.276 116.298,40.142 116.699,40.142 116.833,40.276 116.833,40.903 116.966,41.037 117.367,41.037 117.563,40.841 117.752,40.841 117.928,41.017 118.77,41.859 125.117,41.859 125.211,41.953 125.211,42.295 125.102,42.404 124.785,42.404 124.775,42.415 124.618,42.415 v1(124.572,42.461)
DDR_DQ22: IC4.V3 IC8.G2 | length 39.5
  TopLayer w0.22: v1(92.461,40.922) 92.861,40.522 IC8.G2@92.861,40.525 ; v1(126.561,43.45) IC4.V3@127.061,43.95
  Layer 5 w0.16: v1(92.461,40.922) 93.333,40.922 96.261,43.85 96.996,43.85 97.104,43.742 112.217,43.742 112.234,43.76 112.871,43.76 113.561,44.45 114.309,44.45 114.443,44.316 114.443,44.238 114.576,44.104 114.977,44.104 115.111,44.238 115.111,44.395 115.244,44.529 115.645,44.529 115.779,44.395 115.779,44.238 115.912,44.104 116.313,44.104 116.447,44.238 116.447,44.395 116.58,44.529 116.981,44.529 117.115,44.395 117.115,44.238 117.248,44.104 117.649,44.104 117.783,44.238 117.783,44.395 117.916,44.529 118.317,44.529 118.451,44.395 118.451,44.238 118.584,44.105 118.985,44.105 119.119,44.238 119.119,44.316 119.252,44.45 120.036,44.45 120.236,44.65 121.361,44.65 121.761,44.25 125.761,44.25 v1(126.561,43.45)
DDR_DQ23: IC4.W3 IC8.H7 | length 39.1
  TopLayer w0.22: IC8.H7@96.861,39.725 96.858,39.725 v1(97.258,40.125) ; v1(126.561,42.45) IC4.W3@127.061,42.95
  Layer 5 w0.16: v1(97.258,40.125) 96.611,40.125 96.536,40.2 96.236,40.5 96.236,41.075 96.477,41.316 99.377,41.316 99.411,41.35 99.491,41.35 99.625,41.484 99.625,41.591 99.758,41.724 100.159,41.724 100.293,41.591 100.293,41.153 100.426,41.019 100.827,41.019 100.961,41.153 100.961,41.591 101.094,41.724 101.495,41.724 101.629,41.591 101.629,41.153 101.762,41.019 102.163,41.019 102.297,41.153 102.297,41.591 102.43,41.724 102.831,41.724 102.965,41.591 102.965,41.138 103.098,41.004 103.499,41.004 103.633,41.138 103.633,41.591 103.766,41.724 104.167,41.724 104.301,41.591 104.301,41.461 104.434,41.328 104.527,41.328 105.36,41.328 105.381,41.349 105.997,41.349 106.018,41.328 106.47,41.328 106.492,41.35 107.24,41.35 107.374,41.216 107.374,41.138 107.507,41.004 107.908,41.004 108.042,41.138 108.042,41.342 108.175,41.476 108.576,41.476 108.71,41.342 108.71,41.138 108.843,41.004 109.244,41.004 109.378,41.138 109.378,41.216 109.511,41.35 110.086,41.35 110.102,41.334 117.445,41.334 118.661,42.55 123.233,42.55 123.533,42.85 125.861,42.85 126.26,42.451 v1(126.561,42.45) v1(126.561,42.45)
DDR_DQ24: IC4.Y7 IC8.D7 | length 48.4
  TopLayer w0.22: IC8.D7@96.861,42.925 96.858,42.925 v1(97.258,43.325) ; v1(130.561,41.45) IC4.Y7@131.061,41.95
  Layer 3 w0.15: v1(97.258,43.325) 97.258,42.553 97.657,42.154 97.657,41.504 97.811,41.35 99.061,41.35 99.217,41.35 99.348,41.218 99.348,41.013 99.48,40.882 99.875,40.882 100.006,41.013 100.006,42.148 100.138,42.28 100.533,42.28 100.664,42.148 100.664,41.013 100.796,40.882 101.191,40.882 101.322,41.013 101.322,42.148 101.454,42.28 101.849,42.28 101.98,42.148 101.98,41.013 102.112,40.882 102.507,40.882 102.638,41.013 102.638,42.148 102.77,42.28 103.165,42.28 103.296,42.148 103.296,41.013 103.428,40.882 103.823,40.882 103.954,41.013 103.954,41.218 104.086,41.35 104.161,41.35 ; 104.171,41.34 107.176,41.34 ; 107.186,41.35 107.261,41.35 107.393,41.482 107.393,41.539 107.524,41.671 107.919,41.671 108.051,41.539 108.051,41.17 108.182,41.038 108.577,41.038 108.709,41.17 108.709,41.521 108.84,41.653 109.235,41.653 109.367,41.521 109.367,41.218 109.498,41.087 109.893,41.087 110.025,41.218 ; 110.025,41.218 110.156,41.35 110.294,41.35 114.561,41.35 115.261,40.65 123.816,40.65 124.406,40.06 125.701,40.06 126.186,40.545 126.186,40.605 126.406,40.825 126.716,40.825 126.741,40.8 127.774,40.8 127.799,40.825 128.716,40.825 128.752,40.79 128.876,40.79 129.086,41 129.086,41.865 129.271,42.05 130.386,42.05 130.561,41.875 v1(130.561,41.45)
DDR_DQ25: IC4.W6 IC8.C3 | length 48.1
  TopLayer w0.22: v1(93.261,44.122) 93.661,43.722 IC8.C3@93.661,43.725 ; v1(129.561,42.45) IC4.W6@130.061,42.95
  Layer 3 w0.15: v1(93.261,44.122) 93.633,43.75 93.961,43.75 94.036,43.75 94.168,43.882 94.168,44.768 94.299,44.9 94.694,44.9 94.826,44.768 94.826,42.406 94.957,42.275 95.352,42.275 95.484,42.406 95.484,44.064 95.615,44.196 96.01,44.196 96.142,44.064 96.142,42.406 96.273,42.275 96.668,42.275 96.8,42.406 96.8,43.618 96.931,43.75 97.195,43.75 98.211,43.75 98.461,43.5 98.461,43.101 98.612,42.95 99.014,42.95 100.586,42.95 100.861,42.675 104.048,42.675 104.626,42.097 105.518,42.097 105.526,42.105 106.641,42.105 106.649,42.097 108.431,42.097 108.434,42.1 112.239,42.1 112.254,42.085 114.826,42.085 115.561,41.35 123.661,41.35 123.961,41.05 126.277,41.05 126.302,41.075 126.82,41.075 126.845,41.05 127.557,41.05 127.582,41.075 127.716,41.075 127.936,41.295 127.936,41.429 128.957,42.45 v1(129.561,42.45)
DDR_DQ26: IC4.V6 IC8.C8 | length 48.3
  TopLayer w0.22: IC8.C8@97.661,43.725 97.658,43.725 v1(98.058,44.125) ; v1(129.561,43.45) IC4.V6@130.061,43.95
  Layer 3 w0.15: v1(98.058,44.125) 98.483,44.55 99.006,44.55 99.856,43.7 99.931,43.7 100.063,43.832 100.063,44.277 100.194,44.409 100.589,44.409 100.721,44.277 100.721,43.292 100.852,43.16 101.247,43.16 101.379,43.292 101.379,44.277 101.51,44.409 101.905,44.409 102.037,44.277 102.037,43.232 102.168,43.1 102.563,43.1 102.695,43.232 102.695,44.277 102.826,44.409 103.221,44.409 103.353,44.277 103.353,43.832 103.484,43.7 103.534,43.7 104.187,43.047 104.309,42.925 106.961,42.925 107.158,42.925 107.29,43.057 107.29,43.965 107.422,44.097 107.816,44.097 107.948,43.965 107.948,42.925 107.948,42.575 108.08,42.443 108.474,42.443 108.606,42.575 108.606,42.925 108.606,43.965 108.738,44.097 109.132,44.097 109.264,43.965 109.264,42.925 109.264,42.575 109.396,42.443 109.79,42.443 109.922,42.575 109.922,42.793 110.054,42.925 110.334,42.925 112.411,42.925 112.486,42.925 112.618,43.057 112.618,43.115 112.749,43.247 113.144,43.247 113.276,43.115 113.276,42.633 113.407,42.501 113.802,42.501 113.934,42.633 113.934,43.115 114.065,43.247 114.46,43.247 114.592,43.115 114.592,42.633 114.723,42.501 115.118,42.501 115.25,42.633 115.25,42.793 115.381,42.925 115.806,42.925 116.086,42.925 117.028,41.983 127.844,41.983 129.285,43.424 129.535,43.424 v1(129.561,43.45)
DDR_DQ27: IC4.V9 IC8.C2 | length 48.7
  TopLayer w0.22: v1(92.461,44.122) 92.861,43.722 IC8.C2@92.861,43.725 ; v1(132.561,43.45) IC4.V9@133.061,43.95
  Layer 3 w0.15: v1(92.461,44.122) 92.154,44.122 92.035,44.242 92.035,44.766 92.036,44.767 92.036,45.077 92.035,45.079 92.035,45.174 92.186,45.325 94.594,45.325 95.059,45.789 95.059,46.772 95.761,47.475 116.161,47.475 117.828,45.808 121.169,45.808 121.244,45.808 121.376,45.94 121.376,46.066 121.507,46.197 121.902,46.197 122.034,46.066 122.034,45.676 122.165,45.545 122.56,45.545 122.692,45.676 122.823,45.808 123.082,45.808 124.389,45.808 124.406,45.825 126.716,45.825 126.733,45.808 126.973,45.808 126.99,45.825 132.011,45.825 132.936,44.9 132.936,44.237 132.573,43.874 132.573,43.462 v1(132.561,43.45)
DDR_DQ28: IC4.V8 IC8.A7 | length 48.2
  TopLayer w0.22: IC8.A7@96.861,45.325 96.858,45.325 v1(97.258,45.725) ; v1(131.561,43.45) IC4.V8@132.061,43.95
  Layer 3 w0.15: v1(97.258,45.725) 97.683,46.15 97.925,46.392 106.394,46.392 106.636,46.15 106.886,45.9 106.886,45.075 107.036,44.925 107.436,44.925 107.611,45.1 107.611,45.975 107.842,46.206 108.13,46.206 108.336,46 108.336,44.975 108.461,44.85 108.861,44.85 108.961,44.95 108.961,46.118 109.049,46.206 109.805,46.206 109.961,46.05 109.961,45.325 110.086,45.2 110.782,45.2 110.894,45.313 110.894,46.076 111.024,46.206 111.48,46.206 111.661,46.025 111.661,45.393 111.749,45.305 112.441,45.305 112.536,45.4 112.536,46.081 112.661,46.206 113.123,46.206 113.211,46.118 113.211,45.3 113.311,45.2 113.911,45.2 114.011,45.3 114.011,46.106 114.111,46.206 114.78,46.206 117.736,43.25 117.936,43.25 118.011,43.25 118.143,43.382 118.143,43.718 118.274,43.85 118.669,43.85 118.801,43.718 118.801,43.382 118.932,43.25 119.486,43.25 121.949,43.25 122.849,44.15 130.861,44.15 v1(131.561,43.45)
DDR_DQ29: IC4.W10 IC8.A2 | length 48.4
  TopLayer w0.22: v1(92.461,45.722) 92.861,45.322 IC8.A2@92.861,45.325 ; v1(133.561,42.45) IC4.W10@134.061,42.95
  Layer 3 w0.15: v1(92.461,45.722) 95.089,48.35 118.586,48.35 119.586,47.35 119.859,47.35 119.861,47.352 121.259,47.352 121.661,46.95 132.63,46.95 133.159,46.421 133.159,46.283 133.161,46.281 133.161,46.15 134.026,45.285 134.026,42.915 v1(133.561,42.45)
DDR_DQ30: IC4.V7 IC8.B8 | length 48.2
  TopLayer w0.22: IC8.B8@97.664,44.525 IC8.B8@97.661,44.525 v1(98.061,44.925) ; v1(130.561,43.45) IC4.V7@131.061,43.95
  Layer 3 w0.15: v1(98.061,44.925) 98.486,45.35 99.111,45.35 99.308,45.35 99.44,45.482 99.44,45.818 99.572,45.95 99.966,45.95 100.098,45.818 100.098,45.35 100.098,44.882 100.23,44.75 100.624,44.75 100.756,44.882 100.756,45.35 100.756,45.818 100.888,45.95 101.282,45.95 101.414,45.818 101.414,45.35 101.414,44.882 101.546,44.75 101.94,44.75 102.072,44.882 102.072,45.35 102.072,45.818 102.204,45.95 102.598,45.95 102.73,45.818 102.73,45.35 102.73,44.882 102.862,44.75 103.256,44.75 103.388,44.882 103.388,45.218 103.52,45.35 103.811,45.35 104.654,44.507 105.051,44.507 105.061,44.497 108.45,44.497 108.463,44.511 112.228,44.511 112.253,44.485 112.332,44.485 ; 112.336,44.489 112.355,44.489 112.43,44.489 112.562,44.621 112.562,44.74 112.694,44.872 113.088,44.872 113.22,44.74 113.22,43.682 113.352,43.55 113.746,43.55 113.878,43.682 113.878,44.74 114.01,44.872 114.404,44.872 114.536,44.74 114.536,43.682 114.668,43.55 115.062,43.55 115.194,43.682 115.194,44.649 115.326,44.781 115.72,44.781 115.852,44.649 115.852,44.009 116.369,43.492 117.211,42.65 122.271,42.65 122.346,42.65 122.477,42.782 122.477,43.159 122.609,43.29 123.004,43.29 123.135,43.159 123.135,42.874 123.267,42.742 123.453,42.742 123.67,42.959 123.693,42.982 127.783,42.982 128.016,43.214 128.016,43.505 128.361,43.85 129.821,43.85 130.221,43.45 v1(130.561,43.45)
DDR_DQ31: IC4.Y8 IC8.A3 | length 48.2
  TopLayer w0.22: v1(93.261,45.722) 93.661,45.322 IC8.A3@93.661,45.325 ; v1(131.561,41.45) IC4.Y8@132.061,41.95
  Layer 3 w0.15: v1(93.261,45.722) 93.689,46.15 95.489,47.95 117.061,47.95 118.463,46.548 123.163,46.548 123.653,46.058 124.285,46.058 124.302,46.075 132.114,46.075 132.158,46.031 132.48,46.031 133.239,45.272 133.239,44.659 133.186,44.605 133.186,44.295 133.186,43.605 133.113,43.532 133.113,42.366 132.76,42.013 132.22,42.013 131.76,41.553 131.731,41.553 131.629,41.45 v1(131.561,41.45)
DDR_DQS0_N: IC4.AB6 IC36.G3 | length 30.7
  TopLayer w0.12: v1(106.486,40.93) 106.486,40.924 106.885,40.525 IC36.G3@106.886,40.525 ; v1(129.561,39.453) 129.564,39.453 IC4.AB6@130.061,39.95
  Layer 6 w0.12: v1(106.486,40.93) 106.536,40.93 106.831,41.225 107.323,41.225 107.631,41.532 107.631,41.627 107.631,42.007 107.701,42.077 107.82,42.077 107.884,42.141 107.884,42.333 107.82,42.397 107.701,42.397 107.631,42.468 107.631,42.561 107.631,42.609 108.117,43.095 109.141,43.095 109.511,42.725 109.511,40.189 110.91,38.79 111.041,38.79 111.043,38.788 111.523,38.788 111.526,38.79 113.001,38.79 113.241,39.03 121.102,39.03 121.902,39.83 122.811,39.83 122.998,39.83 123.297,39.83 123.372,39.755 123.372,39.559 123.447,39.484 123.671,39.484 123.746,39.559 123.746,39.755 123.821,39.83 124.061,39.83 129.316,39.83 129.507,39.638 129.507,39.506 v1(129.561,39.453)
DDR_DQS0_P: IC4.AB7 IC36.F3 | length 30.8
  TopLayer w0.12: v1(106.486,41.73) 106.486,41.724 106.885,41.325 IC36.F3@106.886,41.325 ; v1(130.561,39.453) 130.564,39.453 IC4.AB7@131.061,39.95
  Layer 6 w0.12: v1(106.486,41.73) 106.546,41.73 106.831,41.445 107.232,41.445 107.411,41.624 107.411,42.7 108.026,43.315 109.232,43.315 109.731,42.816 109.731,40.28 111.001,39.01 111.132,39.01 111.134,39.008 111.432,39.008 111.435,39.01 112.91,39.01 113.15,39.25 121.011,39.25 121.811,40.05 129.964,40.05 v1(130.561,39.453)
DDR_DQS1_N: IC4.AB1 IC36.B7 | length 29.1
  TopLayer w0.12: v1(109.686,44.922) 109.687,44.922 110.085,44.525 IC36.B7@110.086,44.525 ; v1(124.561,39.45) IC4.AB1@125.061,39.95
  layer 8 w0.11: v1(109.686,44.922) 109.391,44.627 108.972,44.627 108.899,44.7 108.899,44.9 108.826,44.973 108.608,44.973 108.535,44.9 108.535,44.7 108.462,44.627 108.386,44.627 108.184,44.627 107.961,44.85 107.961,45.269 108.034,45.342 108.234,45.342 108.307,45.415 108.307,45.633 108.234,45.706 108.034,45.706 107.961,45.779 107.961,45.85 108.899,46.788 112.711,46.788 112.915,46.788 113.161,47.034 113.161,47.264 113.285,47.388 113.656,47.388 113.779,47.264 113.779,46.292 114.026,46.045 114.57,46.045 114.817,46.292 114.817,47.264 114.941,47.388 115.312,47.388 115.435,47.264 115.435,47.034 115.682,46.788 116.061,46.788 116.237,46.788 123.175,39.85 124.712,39.85 124.956,39.606 124.956,39.514 124.892,39.45 v1(124.561,39.45)
DDR_DQS1_P: IC4.AB2 IC36.C7 | length 29.1
  TopLayer w0.12: v1(109.686,44.122) 109.687,44.122 110.085,43.725 IC36.C7@110.086,43.725 ; v1(125.561,39.45) IC4.AB2@126.061,39.95
  layer 8 w0.11: v1(109.686,44.122) 109.391,44.417 108.097,44.417 107.751,44.763 107.751,45.937 108.812,46.998 112.711,46.998 112.828,46.998 112.951,47.121 112.951,47.351 113.198,47.598 113.742,47.598 113.989,47.351 113.989,46.379 114.113,46.255 114.484,46.255 114.607,46.379 114.607,47.351 114.854,47.598 115.398,47.598 115.645,47.351 115.645,47.121 115.769,46.998 116.061,46.998 116.324,46.998 123.262,40.06 124.799,40.06 125.166,39.693 125.166,39.514 125.23,39.45 v1(125.561,39.45)
DDR_DQS2_N: IC4.Y2 IC8.G3 | length 39.2
  TopLayer w0.12: IC8.G3@93.661,40.525 v1(94.068,40.118) ; v1(125.561,41.479) 125.59,41.479 IC4.Y2@126.061,41.95
  Layer 5 w0.12: v1(94.068,40.118) 94.017,40.067 93.821,40.067 93.751,39.997 93.751,39.697 94.074,39.374 94.361,39.374 94.527,39.374 94.602,39.448 94.602,39.645 94.676,39.72 94.901,39.72 94.976,39.645 94.976,39.448 95.05,39.374 95.484,39.374 96.88,39.374 97.498,38.756 99.711,38.756 99.835,38.756 99.961,38.881 99.961,39.056 100.216,39.31 100.775,39.31 101.029,39.056 101.029,38.501 101.155,38.375 101.531,38.375 101.657,38.501 101.912,38.756 102.536,38.756 107.567,38.756 108.165,39.354 110.177,39.354 110.661,38.87 117.481,38.87 119.086,40.475 121.447,40.475 121.507,40.475 121.581,40.55 121.581,40.746 121.656,40.821 121.881,40.821 121.955,40.746 121.955,40.55 122.03,40.475 122.255,40.475 122.329,40.55 122.329,40.746 122.404,40.821 122.629,40.821 122.703,40.746 122.703,40.55 122.778,40.475 123.161,40.475 123.5,40.475 124.075,41.05 125.701,41.05 125.946,41.295 125.946,41.394 125.875,41.464 125.575,41.464 v1(125.561,41.479)
DDR_DQS2_P: IC4.Y3 IC8.F3 | length 39.2
  TopLayer w0.12: IC8.F3@93.661,41.325 v1(94.061,40.925) ; v1(126.55,41.45) 126.561,41.45 IC4.Y3@127.061,41.95
  Layer 5 w0.12: v1(94.061,40.925) 94.019,40.883 94.019,40.579 93.531,40.091 93.531,39.605 93.983,39.154 96.789,39.154 97.407,38.536 99.711,38.536 99.927,38.536 100.181,38.79 100.181,38.965 100.307,39.09 100.683,39.09 100.809,38.965 100.809,38.41 101.064,38.155 101.623,38.155 101.877,38.41 102.003,38.536 102.536,38.536 107.658,38.536 108.256,39.134 110.086,39.134 110.57,38.65 117.572,38.65 119.177,40.255 123.591,40.255 124.166,40.83 125.792,40.83 126.166,41.204 126.166,41.394 126.236,41.464 126.536,41.464 v1(126.55,41.45)
DDR_DQS3_N: IC4.W8 IC8.B7 | length 48.1
  TopLayer w0.12: IC8.B7@96.861,44.525 IC8.B7@96.861,44.525 97.258,44.924 v1(97.258,44.925) ; v1(131.561,42.45) IC4.W8@132.061,42.95
  Layer 3 w0.11: v1(97.258,44.925) 96.963,44.63 96.281,44.63 95.961,44.95 95.961,45.006 95.961,45.425 96.034,45.497 96.275,45.497 96.347,45.57 96.347,45.789 96.275,45.861 96.034,45.861 95.961,45.934 95.961,46.15 95.961,46.425 96.286,46.75 115.161,46.75 117.237,44.674 117.85,44.674 118.712,44.674 118.959,44.92 118.959,45.014 119.082,45.138 119.453,45.138 119.577,45.014 119.577,44.066 119.824,43.82 120.368,43.82 120.615,44.066 120.615,45.014 120.738,45.138 121.109,45.138 121.233,45.014 121.233,44.344 121.48,44.097 122.024,44.097 122.271,44.344 122.271,44.55 122.394,44.674 122.511,44.674 122.598,44.674 122.745,44.82 129.561,44.82 129.98,44.82 130.053,44.748 130.053,44.587 130.126,44.514 130.344,44.514 130.417,44.587 130.417,44.748 130.49,44.82 130.586,44.82 130.922,44.82 131.956,43.787 131.956,42.845 131.956,42.514 131.892,42.45 v1(131.561,42.45)
DDR_DQS3_P: IC4.W9 IC8.C7 | length 48.1
  TopLayer w0.12: IC8.C7@96.861,43.725 IC8.C7@96.861,43.725 v1(97.258,44.125) v1(97.258,44.125) ; v1(132.561,42.45) IC4.W9@133.061,42.95
  Layer 3 w0.11: v1(97.258,44.125) 96.963,44.42 96.194,44.42 95.751,44.863 95.751,46.512 96.199,46.96 115.248,46.96 117.324,44.884 117.85,44.884 118.625,44.884 118.749,45.007 118.749,45.101 118.996,45.348 119.54,45.348 119.787,45.101 119.787,44.153 119.91,44.03 120.281,44.03 120.405,44.153 120.405,45.101 120.652,45.348 121.196,45.348 121.443,45.101 121.443,44.431 121.566,44.307 121.937,44.307 122.061,44.431 122.061,44.637 122.307,44.884 122.511,44.884 122.658,45.03 131.009,45.03 132.166,43.874 132.166,42.932 132.166,42.514 132.23,42.45 v1(132.561,42.45)
DDR_ODT: IC4.AD1 IC8.K1 IC36.K1 R123.1 | length 42.7
  TopLayer w0.22: R123.1@86.951,38.033 v1(88.451,38.033) ; v1(91.664,37.725) 92.064,38.125 IC8.K1@92.061,38.125 ; v1(104.889,37.725) 105.289,38.125 IC36.K1@105.286,38.125 ; v1(124.561,37.442) 124.561,37.45 IC4.AD1@125.061,37.95
  Layer 3 w0.15: v1(88.451,38.033) 88.759,37.725 v1(91.664,37.725) 92.044,38.105 94.206,38.105 94.561,37.75 97.306,37.75 97.661,38.105 104.509,38.105 v1(104.889,37.725) 105.269,38.105 106.361,38.105 106.436,38.105 106.535,38.203 106.535,38.379 106.633,38.478 107.094,38.478 107.193,38.379 107.193,37.83 107.291,37.731 107.752,37.731 107.851,37.83 107.851,38.379 107.949,38.478 108.41,38.478 108.509,38.379 108.509,38.203 108.607,38.105 108.944,38.105 109.056,38.105 109.411,37.75 110.461,37.75 110.861,38.15 122.261,38.15 122.936,37.475 124.528,37.475 v1(124.561,37.442)
DDR_RAS_N: IC4.AD3 IC8.J3 IC36.J3 R117.1 | length 44.2
  TopLayer w0.22: R117.1@86.931,39.26 v1(88.431,39.26) ; v1(93.264,38.525) 93.664,38.925 IC8.J3@93.661,38.925 ; v1(106.531,39.315) 106.564,39.315 106.796,39.083 106.796,39.064 106.886,38.974 IC36.J3@106.886,38.925 ; v1(126.561,37.442) 126.561,37.45 IC4.AD3@127.061,37.95
  Layer 3 w0.15: v1(88.431,39.26) 92.529,39.26 v1(93.264,38.525) 93.989,39.25 96.611,39.25 97.011,38.85 106.065,38.85 106.565,39.35 107.311,39.35 107.386,39.35 107.518,39.482 107.518,39.564 107.649,39.696 108.044,39.696 108.176,39.564 108.176,39.136 108.307,39.004 108.702,39.004 108.834,39.136 108.834,39.218 108.965,39.35 109.261,39.35 109.961,39.35 110.318,38.993 123.151,38.993 124.194,37.95 125.63,37.95 126.13,37.45 126.553,37.45 v1(126.561,37.442)
DDR_RST_N: IC4.AH7 IC8.T2 IC36.T2 R125.1 | length 41.6
  TopLayer w0.15: v1(130.561,33.45) IC4.AH7@131.061,33.95
  TopLayer w0.22: v1(92.464,32.925) 92.864,33.325 IC8.T2@92.861,33.325 ; v1(105.689,32.925) 106.089,33.325 IC36.T2@106.086,33.325
  Layer 5 w0.15: v1(92.464,32.925) 92.841,32.548 105.312,32.548 v1(105.689,32.925) 106.066,32.548 112.359,32.548 112.663,32.852 129.963,32.852 v1(130.561,33.45)
  BottomLayer w0.15: v1(92.464,32.925) 92.464,32.242 R125.1@92.536,32.17
DDR_WE_N: IC4.AF2 IC8.L3 IC36.L3 R119.1 | length 45.3
  TopLayer w0.22: v1(93.264,36.925) 93.664,37.325 IC8.L3@93.661,37.325 ; v1(106.489,36.925) 106.889,37.325 IC36.L3@106.886,37.325 ; v1(125.561,35.45) IC4.AF2@126.061,35.95
  layer 8 w0.15: v1(84.489,37.36) 86.876,37.36 87.273,37.757 87.927,37.757 88.098,37.586 89.025,37.586 89.309,37.302 92.887,37.302 v1(93.264,36.925) 93.641,36.548 106.112,36.548 v1(106.489,36.925) 106.864,36.55 115.561,36.55 116.561,35.55 123.461,35.55 123.963,35.048 124.743,35.048 125.136,35.441 125.552,35.441 v1(125.561,35.45)
  BottomLayer w0.22: R119.1@83.911,37.36 v1(84.489,37.36)